# Altium PCB Main.PcbDoc (part 1 of 2)
Units mm, origin at the board's own origin, x right, y up, seen from the top; angles counter-clockwise.
Board outline 200 x 100 mm, 2 copper layers (Top Layer, Bottom Layer), stack 1.57 mm thick; 127 components, 91 nets, 374 pads, 81 vias.
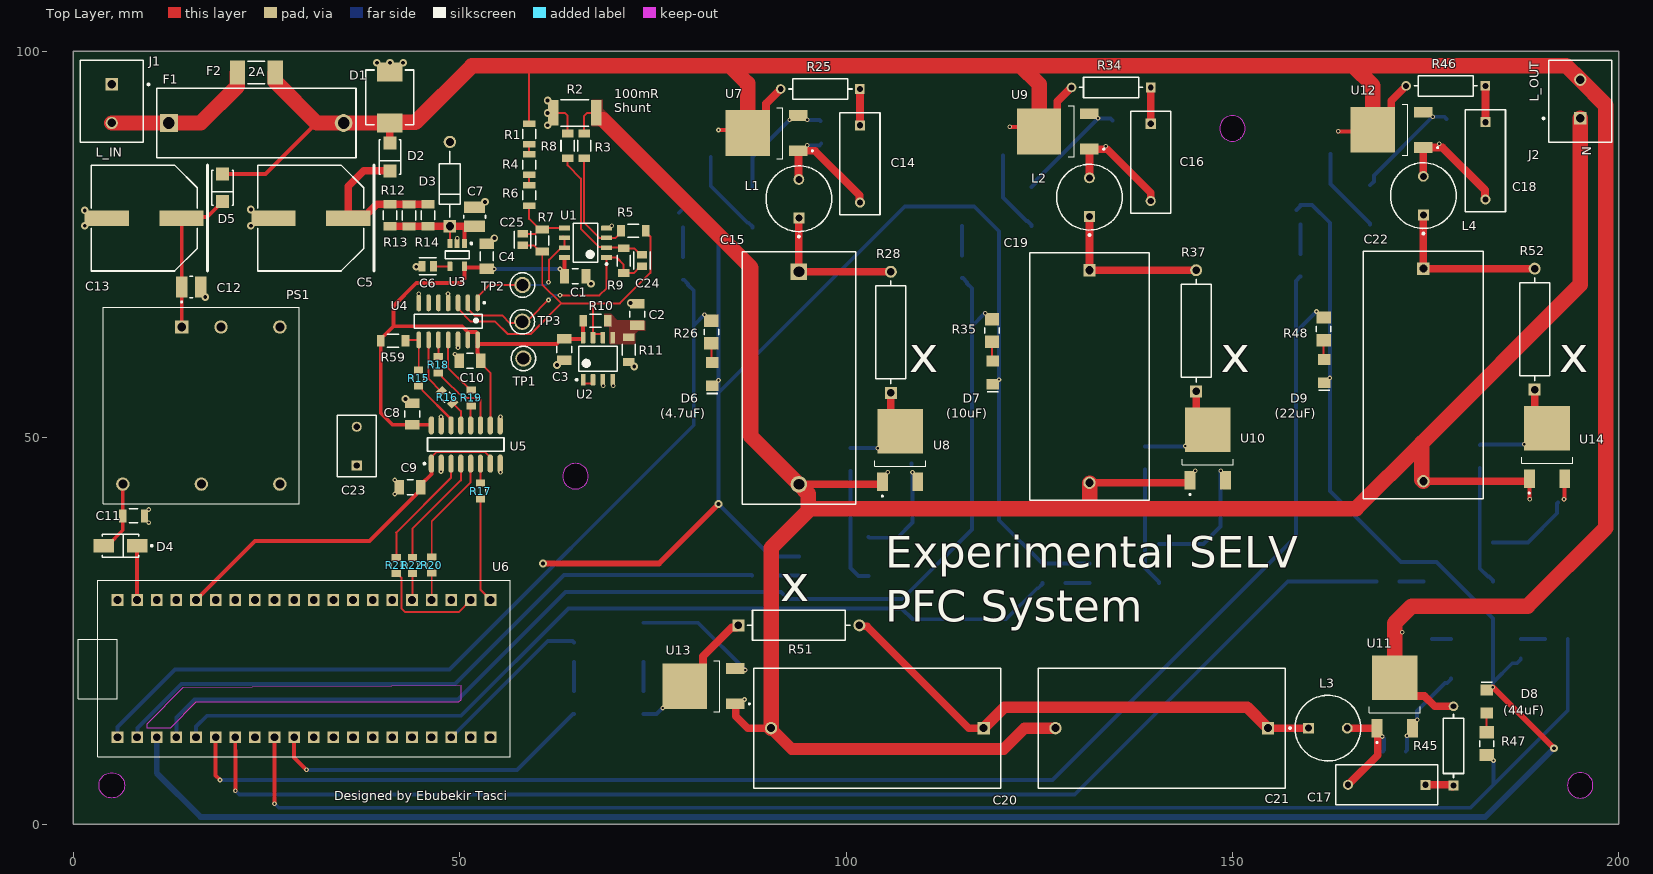
[diagram p0: Top Layer view]
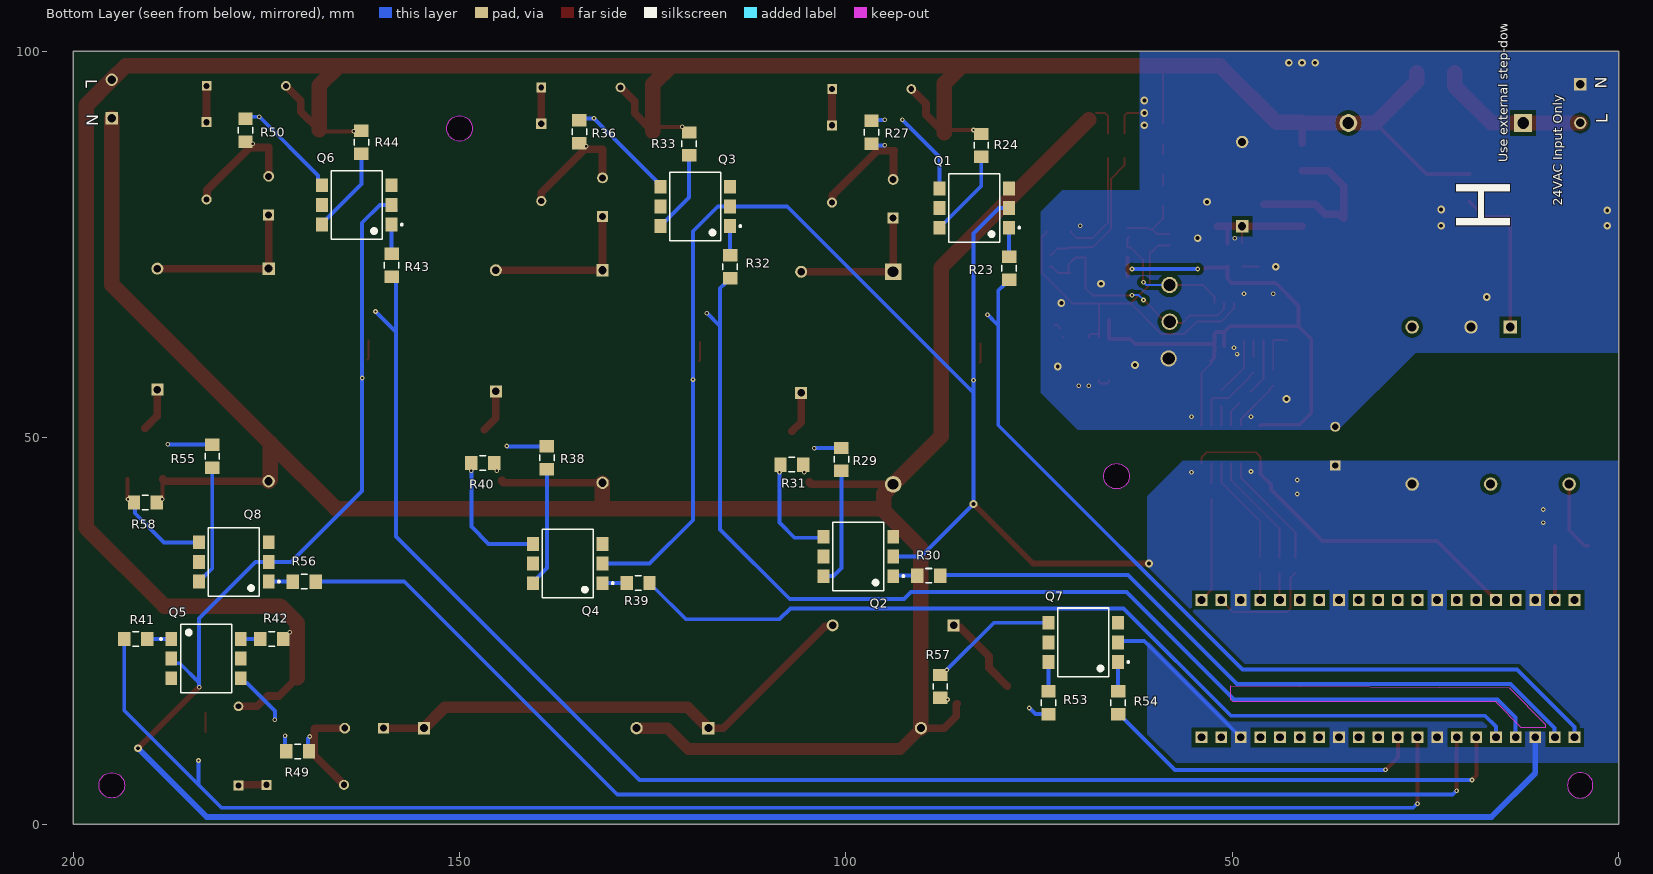
[diagram p1: Bottom Layer view, seen from below]
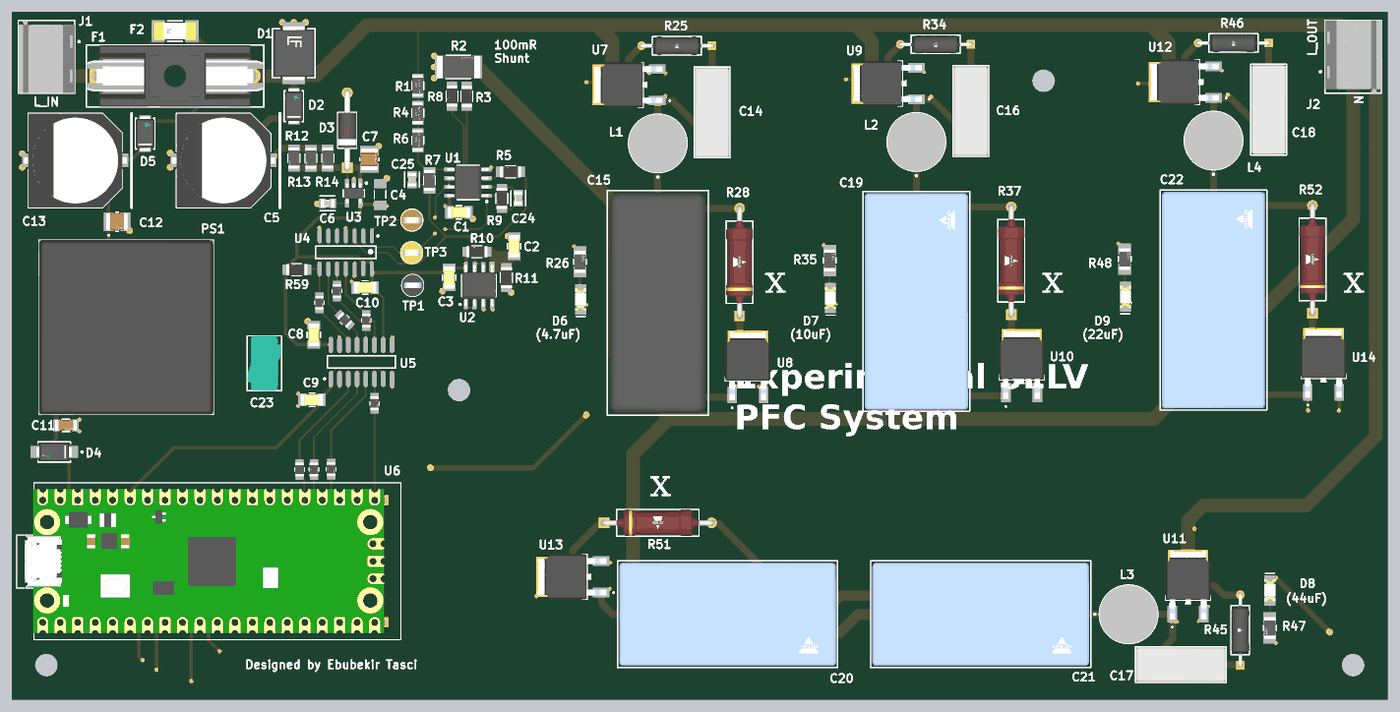
[diagram p3: 3D render of the assembled board from above, using the file's embedded part models]
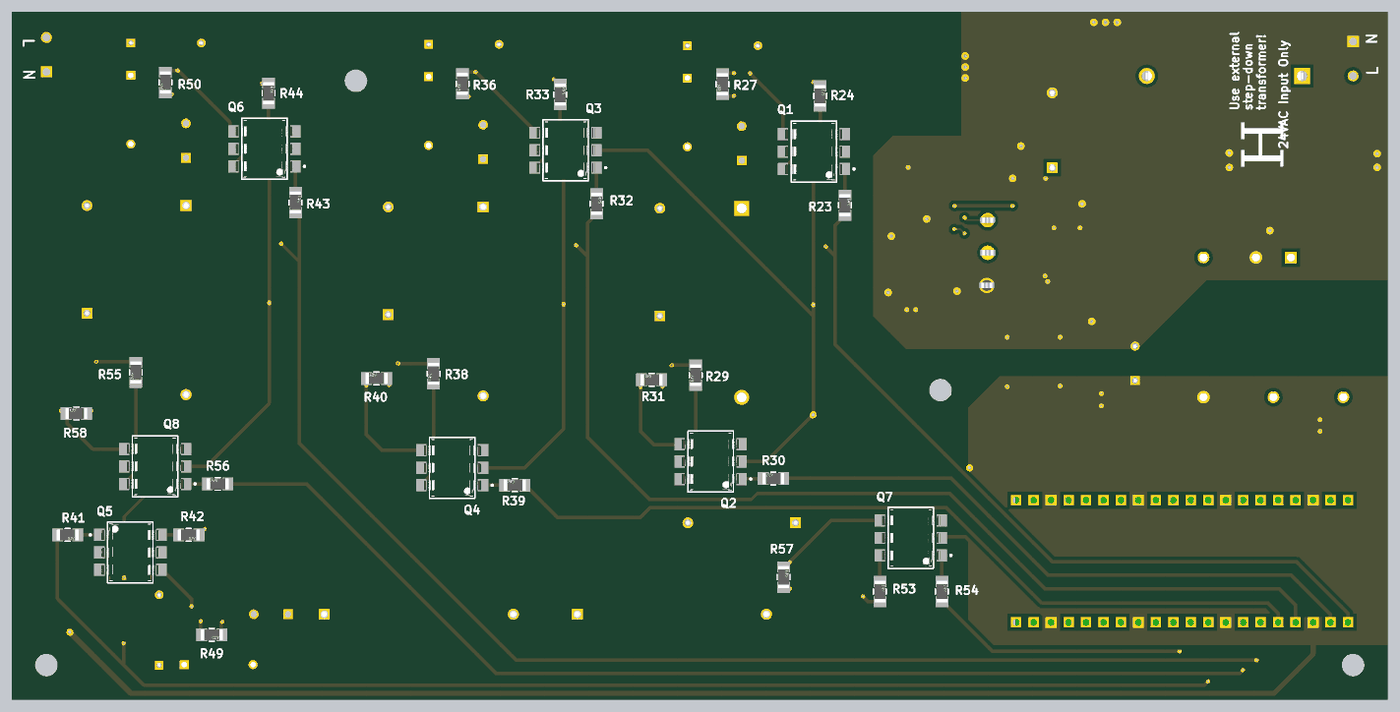
[diagram p4: 3D render of the assembled board from below, using the file's embedded part models]

## Layer stack, top to bottom
Top Solder: solder mask 0.0102, Solder Resist, Dk 3.5
Top Layer: signal copper 0.0356
Dielectric 1: core 1.4986, Core-043, Dk 4.3
Bottom Layer: signal copper 0.0356
Bottom Solder: solder mask 0.0102, Solder Resist, Dk 3.5

## Board outline
0,0 200,0 200,100 0,100
cut-out: 148.35,90 ccw(c150,90) 150,88.35 ccw(c150,90) 151.65,90 ccw(c150,90) 150,91.65 ccw(c150,90)
cut-out: 193.35,5 ccw(c195,5) 195,3.35 ccw(c195,5) 196.65,5 ccw(c195,5) 195,6.65 ccw(c195,5)
cut-out: 63.35,45 ccw(c65,45) 65,43.35 ccw(c65,45) 66.65,45 ccw(c65,45) 65,46.65 ccw(c65,45)
cut-out: 5,3.35 cw(c5,5) 3.35,5 cw(c5,5) 5,6.65 cw(c5,5) 6.65,5 cw(c5,5)

## Design rules (kind name [scope] priority, off if disabled: settings)
Clearance [All] p1: gap=0.125 ignorepadtopadclearanceinfootprint=TRUE except(0.5: Arc-Fill Arc-Poly Arc-Region Track-Fill Track-Poly Track-Region SMDPad-Fill SMDPad-Poly SMDPad-Region THPad-Fill THPad-Poly THPad-Region Via-Fill Via-Poly Via-Region Fill-Fill Fill-Poly Fill-Region Poly-Poly Poly-Region Region-Region) // JLCPCB_Standard_5mil
HoleSize [All] p1: absolutevalues=TRUE maxlimit=6.35 minlimit=0.3 maxpercent=80.000 minpercent=20.000 // JLCPCB_Min_0.3mm
HoleToHoleClearance [All] p1: gap=0.2 allowstackedmicrovias=TRUE // JLCPCB_SafeMin_20mil
MinimumSolderMaskSliver [All] p1: minsoldermaskwidth=0.1
PlaneClearance [All] p1: clearance=0.254
PlaneConnect [All] p1: planeconnectstyle=Direct reliefexpansion=0.254 reliefentries=4 reliefconductorwidth=0.254 reliefairgap=0.254
PolygonConnect [All] p1: connectstyle=Direct reliefconductorwidth=0.254 reliefentries=4 polygonreliefangle="90 Angle" airgapwidth=0.254
RoutingVias [All] p1: holewidth=0.305 width=0.457 viastyle="Through Hole" minholewidth=0.305 minwidth=0.457 maxholewidth=3.302 maxwidth=6.35 // JLCPCB_UserSpec_0.3mmHole_0.45mmDia
ShortCircuit AllowRF [InComponent('FL1') vs InNet('GND')] p1: allowed=TRUE
ShortCircuit [All] p2: allowed=FALSE
SignalStimulus "Schematic Signal Stimulus_1" [InNet('AGND')] p1: kind=1 level=1 starttime=0.000 stoptime=10.00m periodtime=20.00m
SignalStimulus "Schematic Signal Stimulus" [InNet('NetF1_1')] p2: kind=1 level=1 starttime=0.000 stoptime=10.00m periodtime=20.00m
SilkToSilkClearance [All] p1: silktosilkclearance=0.152
SilkToSolderMaskClearance [IsPad] p1: minsilkscreentomaskgap=0.152 clearancetoexposedcopper=TRUE // JLCPCB_Standard_0.15mm
SolderMaskExpansion Via_Expansion [IsVia] p1: expansion=0 istentingtop=FALSE
SolderMaskExpansion [All] p2: expansion=0.05 istentingtop=FALSE // JLCPCB_Standard
SupplyNets "Schematic Supply Nets_12" [InNet('NetF1_1')] p1: voltage=230.0
SupplyNets "Schematic Supply Nets_11" [InNet('+3V3_D')] p2: voltage=0.000
SupplyNets "Schematic Supply Nets_10" [InNet('DGND')] p3: voltage=0.000
SupplyNets "Schematic Supply Nets_9" [InNet('+5V')] p4: voltage=0.000
SupplyNets "Schematic Supply Nets_8" [InNet('AGND')] p5: voltage=0.000
SupplyNets "Schematic Supply Nets_7" [InNet('N')] p6: voltage=0.000
SupplyNets "Schematic Supply Nets_6" [InNet('+3V3_A')] p7: voltage=0.000
SupplyNets "Schematic Supply Nets_5" [InNet('L')] p8: voltage=0.000
SupplyNets "Schematic Supply Nets_4" [InNet('+1V65')] p9: voltage=0.000
Width [All] p1: maxlimit=2.54 minlimit=0.127 preferedwidth=0.254 // JLCPCB_Standard_5mil
22 further rules are at their usual default settings.

## Classes and differential pairs
component class Capacitor_Bank: C14 C15 C16 C17 C18 C19 C20 C21 C22 D6 D7 D8 D9 L1 L2 L3 L4 Q1 Q2 Q3 Q4 Q5 Q6 Q7 Q8 R23 R24 R25 R26 R27 R28 R29 R30 R31 R32 R33 R34 R35 R36 R37 R38 R39 R40 R41 R42 R43 R44 R45 R46 R47 R48 R49 R50 R51 R52 R53 R54 R55 R56 R57 R58 U7 U8 U9 U10 U11 U12 U13 U14
component class Measurement_Control: C1 C2 C3 C4 C5 C6 C7 C8 C9 C10 C11 C12 C13 C23 C24 C25 D1 D2 D3 D4 D5 F1 F2 J1 J2 PS1 R1 R2 R3 R4 R5 R6 R7 R8 R9 R10 R11 R12 R13 R14 R15 R16 R17 R18 R19 R20 R21 R22 R59 TP1 TP2 TP3 U1 U2 U3 U4 U5 U6

## Components (designator, comment, footprint, x,y, rotation, side; value= is the part's Value field where it differs from the comment)
C1 "100nF 1206" FP-C1206X104J3GACTU-MFG 64.967,70.861 r0 top
C2 "100nF 1206" FP-C1206X104J3GACTU-MFG 72.996,65.942 r90 top
C3 "100nF 1206" FP-C1206X104J3GACTU-MFG 63.561,61.378 r270 top
C4 "2.2uF 1206" CAPC1206(3216)190_M 53.533,73.459 r270 top value=2.2uF
C5 "EEVFK1J221Q" PNSC-FK-V-H13_V 30.75,78.4 r180 top
C6 "10nF 0805" FP-C0805C-DN-MFG 45.888,72.16 r180 top value="10,000 pF"
C7 "1uF 1210" FP-CL32-IPC_C 51.955,78.565 r90 top
C8 "100nF 1206" FP-C1206X104J3GACTU-MFG 43.871,53.043 r90 top
C9 "100nF 1206" FP-C1206X104J3GACTU-MFG 43.614,43.591 r180 top
C10 "100nF 1206" FP-C1206X104J3GACTU-MFG 51.349,59.928 r180 top
C11 "10uF 1206" FP-C1206C-EH-MFG 7.83,39.861 r0 top value=10uF
C12 "1uF 1210" FP-CL32-IPC_C 15.275,69.494 r0 top
C13 "EEVFK1J221Q" PNSC-FK-V-H13_V 9.2,78.4 r180 top
C14 "10nF Y2" FP-R46KF310040P1M-MFG 101.8,85.4 r270 top
C15 "4.7uF PP" FP-C4BUY-MFG 93.9,57.7 r270 top
C16 "10nF Y2" FP-R46KF310040P1M-MFG 139.428,85.6 r270 top
C17 "10nF Y2" FP-R46KF310040P1M-MFG 169.958,5.071 r180 top
C18 "10nF Y2" FP-R46KF310040P1M-MFG 182.728,85.8 r270 top
C19 "10uF PP" FP-F17725102000-MFG 131.5,57.9 r270 top
C20 "22uF PP" FP-F17725102000-MFG 104.05,12.4 r180 top
C21 "22uF PP" FP-F17725102000-MFG 140.85,12.4 r180 top
C22 "22uF PP" FP-F17725102000-MFG 174.7,58.1 r270 top
C23 "2.2nF Y2" FP-DE2_D8_T5_F5_d0_6-0_05-MFG 36.7,48.9 r90 top
C24 "10nF 0805" FP-C0805C-DN-MFG 73.608,72.909 r270 top value="10,000 pF"
C25 "10nF 0805" FP-C0805C-DN-MFG 58.165,75.61 r90 top value="10,000 pF"
D1 "SMCJ36CA" FP-SMCJ-MFG 40.98,94 r90 top
D2 "M7-HT" FP-SMA-MFG 40.98,86.3 r90 top
D3 "1N4742APE3/TR8" FP-1N4742APE3-TR8-MFG 48.742,82.794 r90 top
D4 "SS14" FP-403AE-MFG 6.13,36 r0 top
D5 "M7-HT" FP-SMA-MFG 19.349,82.316 r90 top
D6 "1206 GREEN" WL-SMCW_1206_150120xx75000 82.7,58.2 r90 top
D7 "1206 GREEN" WL-SMCW_1206_150120xx75000 119,58.4 r90 top
D8 "1206 GREEN" WL-SMCW_1206_150120xx75000 182.9,15.856 r270 top
D9 "1206 GREEN" WL-SMCW_1206_150120xx75000 161.9,58.6 r90 top
F1 "64600001223" FP-64600001223-MFG 23.7,90.7 r0 top
F2 "SEF1300" FP-0451-MFG 23.7,97.229 r0 top
J1 "282836-2" TECO-282836-2_V 5,93.2 r270 top
J2 "282836-2" TECO-282836-2_V 195,93.8 r90 top
L1 "820uH 1A" INDR62-500-1100X850X1100 93.9,80.9 r90 top
L2 "820uH 1A" INDR62-500-1100X850X1100 131.5,81.1 r90 top
L3 "820uH 1A" INDR62-500-1100X850X1100 162.354,12.4 r0 top
L4 "820uH 1A" INDR62-500-1100X850X1100 174.7,81.3 r90 top
PS1 "REC20K-4805SZ" CONV_REC20K-4805SZ 16.59,54.14 r270 top
Q1 "MOC3063S-TA1" FP-646BY-MFG 83.4,79.7 r0 bottom
Q2 "MOC3023XSM" FP-646BY-MFG 98.405,34.61 r0 bottom
Q3 "MOC3063S-TA1" FP-646BY-MFG 119.5,79.9 r0 bottom
Q4 "MOC3023XSM" FP-646BY-MFG 136.005,33.7 r0 bottom
Q5 "MOC3063S-TA1" FP-646BY-MFG 182.8,21.4 r180 bottom
Q6 "MOC3063S-TA1" FP-646BY-MFG 163.3,80.1 r0 bottom
Q7 "MOC3023XSM" FP-646BY-MFG 69.3,23.5 r0 bottom
Q8 "MOC3023XSM" FP-646BY-MFG 179.205,33.9 r0 bottom
R1 "100k 1206" FP-RQ732B-IPC_C 59,89.273 r90 top value=100KΩ
R2 "VMS-R100-1.0-U" FP-CRA2512-IPC_C 64.9,92 r0 top
R3 "10k 1206" FP-RT1206-MFG 66.129,87.746 r90 top value=10KΩ
R4 "100k 1206" FP-RQ732B-IPC_C 59,85.307 r90 top value=100KΩ
R5 "33k 1206" FP-RT1206-MFG 72.479,76.756 r180 top value=33KΩ
R6 "100k 1206" FP-RQ732B-IPC_C 59,81.341 r90 top value=100KΩ
R7 "4.7k 1206" FP-AT1206-IPC_B 60.7,75.5 r90 top
R8 "10k 1206" FP-RT1206-MFG 63.975,87.746 r270 top value=10KΩ
R9 "33k 1206" FP-RT1206-MFG 71.229,72.886 r270 top value=33KΩ
R10 "10k 1206" FP-RT1206-MFG 67.591,65.129 r180 top value=10KΩ
R11 "10k 1206" FP-RT1206-MFG 71.879,61.363 r90 top value=10KΩ
R12 "4.7k 1206" FP-AT1206-IPC_B 40.991,78.763 r270 top
R13 "4.7k 1206" FP-AT1206-IPC_B 43.457,78.729 r270 top
R14 "4.7k 1206" FP-AT1206-IPC_B 45.923,78.766 r270 top
R15 "33R 0805" FP-RT0805-MFG 44.7,57.7 r270 top value=33Ω
R16 "33R 0805" FP-RT0805-MFG 48.382,55.208 r315 top value=33Ω
R17 "33R 0805" FP-RT0805-MFG 52.714,43.071 r270 top value=33Ω
R18 "33R 0805" FP-RT0805-MFG 47.252,59.408 r270 top value=33Ω
R19 "33R 0805" FP-RT0805-MFG 51.504,55.129 r270 top value=33Ω
R20 "33R 0805" FP-RT0805-MFG 46.4,33.5 r270 top value=33Ω
R21 "33R 0805" FP-RT0805-MFG 41.813,33.46 r270 top value=33Ω
R22 "33R 0805" FP-RT0805-MFG 43.902,33.46 r270 top value=33Ω
R23 "330R 1206" FP-RMCF1206-IPC_A 78.895,71.897 r90 bottom
R24 "330R 1206" FP-RMCF1206-IPC_A 82.5,87.8 r90 bottom
R25 "39R 1W" FP-G001R1000FE1280-MFG 96.672,95.1 r180 top
R26 "330R 1206" FP-RMCF1206-IPC_A 82.584,63.656 r90 top
R27 "330R 1206" FP-RMCF1206-IPC_A 96.7,89.5 r270 bottom
R28 "100R 2W" FP-PR02000201003JA100-MFG 105.8,63.62 r90 top
R29 "330R 1206" FP-RMCF1206-IPC_A 100.6,47.176 r270 bottom
R30 "330R 1206" FP-RMCF1206-IPC_A 89.299,32.131 r0 bottom
R31 "330R 1206" FP-RMCF1206-IPC_A 107,46.5 r0 bottom
R32 "330R 1206" FP-RMCF1206-IPC_A 114.995,72.097 r90 bottom
R33 "330R 1206" FP-RMCF1206-IPC_A 120.3,88 r90 bottom
R34 "39R 1W" FP-G001R1000FE1280-MFG 134.3,95.3 r180 top
R35 "330R 1206" FP-RMCF1206-IPC_A 118.891,63.856 r90 top
R36 "330R 1206" FP-RMCF1206-IPC_A 134.5,89.554 r270 bottom
R37 "100R 2W" FP-PR02000201003JA100-MFG 145.3,63.82 r90 top
R38 "330R 1206" FP-RMCF1206-IPC_A 138.7,47.376 r270 bottom
R39 "330R 1206" FP-RMCF1206-IPC_A 126.899,31.184 r0 bottom
R40 "330R 1206" FP-RMCF1206-IPC_A 147,46.7 r0 bottom
R41 "330R 1206" FP-RMCF1206-IPC_A 191.906,23.94 r180 bottom
R42 "330R 1206" FP-RMCF1206-IPC_A 174.304,23.94 r180 bottom
R43 "330R 1206" FP-RMCF1206-IPC_A 158.795,72.297 r90 bottom
R44 "330R 1206" FP-RMCF1206-IPC_A 162.7,88.2 r90 bottom
R45 "39R 1W" FP-G001R1000FE1280-MFG 178.6,10.1 r90 top
R46 "39R 1W" FP-G001R1000FE1280-MFG 177.6,95.5 r180 top
R47 "330R 1206" FP-RMCF1206-IPC_A 182.9,10.4 r270 top
R48 "330R 1206" FP-RMCF1206-IPC_A 161.799,64.056 r90 top
R49 "330R 1206" FP-RMCF1206-IPC_A 170.95,9.4 r180 bottom
R50 "330R 1206" FP-RMCF1206-IPC_A 177.7,89.754 r270 bottom
R51 "100R 2W" FP-PR02000201003JA100-MFG 93.9,25.7 r0 top
R52 "100R 2W" FP-PR02000201003JA100-MFG 189.1,64.02 r90 top
R53 "330R 1206" FP-RMCF1206-IPC_A 73.805,15.697 r90 bottom
R54 "330R 1206" FP-RMCF1206-IPC_A 64.795,15.697 r90 bottom
R55 "330R 1206" FP-RMCF1206-IPC_A 182,47.576 r270 bottom
R56 "330R 1206" FP-RMCF1206-IPC_A 170.099,31.36 r0 bottom
R57 "330R 1206" FP-RMCF1206-IPC_A 87.8,17.8 r90 bottom
R58 "330R 1206" FP-RMCF1206-IPC_A 190.65,41.6 r0 bottom
R59 "10k 1206" FP-RT1206-MFG 41.403,62.521 r180 top value=10KΩ
TP1 "5011" KSTN-5011_V 58.255,60.229 r0 top
TP2 "5013" KSTN-5013_V 58.142,69.737 r0 top
TP3 "5014" KSTN-5014_V 58.116,64.983 r0 top
U1 "OPA2333AIDR" D0008A_N 66.3,75.2 r180 top
U2 "OPA2333AIDR" D0008A_N 67.9,60.2 r90 top
U3 "LP2985-33DBVR" DBV0005A_M 49.692,73.635 r270 top
U4 "MCP3204T-CI/SL" SOIC-SL14_N 48.532,65.037 r270 top
U5 "Si8641BC-B-IS1" SLAB-SOIC-16-NB_M 50.8,49.1 r90 top
U6 "RASPBERRY_PI_PICO_2" RASPBERRY_PI_PICO 28.6,20.1 r90 top
U7 "BT136S-600E,118" IC_BT136S-600E,118 89.703,89.404 r180 top
U8 "BT136S-600E,118" IC_BT136S-600E,118 107,48.375 r90 top
U9 "BT136S-600E,118" IC_BT136S-600E,118 127.4,89.604 r180 top
U10 "BT136S-600E,118" IC_BT136S-600E,118 146.8,48.575 r90 top
U11 "BT136S-600E,118" IC_BT136S-600E,118 171,16.5 r90 top
U12 "BT136S-600E,118" IC_BT136S-600E,118 170.6,89.804 r180 top
U13 "BT136S-600E,118" IC_BT136S-600E,118 81.546,17.847 r180 top
U14 "BT136S-600E,118" IC_BT136S-600E,118 190.7,48.775 r90 top

## Footprints (in the part's own frame and the unit in brackets; to place one, negate y for a bottom-side part, rotate by r counter-clockwise, add the part's x,y. Pads: shape width x height; smd on the part's side, far side on the other; paste and mask are expansions set on the pad)
CAPC1206(3216)190_M [mm] "Chip Capacitor, Body 3.2x1.6mm, Height 1.9mm, IPC Low Density"
  rect 1.35x1.9 smd: 1(-1.6,0) 2(1.6,0)
  silkscreen extent -0.55,-0.85 0.55,0.85, body extent -1.7,-0.9 1.7,0.9, height 1.9
CONV_REC20K-4805SZ [mm]
  rect 1.725x1.725 / inner round 1.725 / far side rect 1.725x1.725 hole 1.15: 1(-10.16,-2.54)
  round 1.725 hole 1.15: 2(-10.16,2.54) 3(-10.16,10.16) 4(10.16,10.16) 5(10.16,0) 6(10.16,-10.16)
  silkscreen extent -13.5,-12.7 12.7,12.7, body extent -12.7,-12.7 12.7,12.7, height 10.2
D0008A_N [mm] "SOIC, 8-Leads, Body 5x4mm, Pitch 1.27mm, IPC Medium Density"
  rrect17% 1.45x0.6 smd: 1(-2.725,1.905) 2(-2.725,0.635) 3(-2.725,-0.635) 4(-2.725,-1.905) 5(2.725,-1.905) 6(2.725,-0.635) 7(2.725,0.635) 8(2.725,1.905)
  silkscreen extent -2.85,-2.5 1.6,2.88, body extent -3,-2.45 3,2.45, height 1.63
DBV0005A_M [mm] "SOT23, 5-Leads, Body 3.05x1.75mm, Pitch 0.95mm, IPC Low Density"
  rrect15% 1.2x0.65 smd: 1(-1.475,0.95) 2(-1.475,0) 3(-1.475,-0.95) 4(1.475,-0.95) 5(1.475,0.95)
  silkscreen extent -1.6,-1.55 0.5,1.95, body extent -1.42,-1.46 1.42,1.46, height 1.08
FP-1N4742APE3-TR8-MFG [mm]
  rect 1.6x1.6 hole 1.05 paste-2539.97 mask+0: 1(-5.455,0)
  round 1.6 hole 1.05 paste-2539.97 mask+0: 2(5.455,0)
  silkscreen extent -4.25,-1.36 4.25,1.36, body extent -6.35,-1.46 6.35,1.46, height 0.25
FP-403AE-MFG [mm]
  rect 2.65x1.75 smd paste+0 mask+0: 1(-2.15,0) 2(2.15,0)
  silkscreen extent -2.37,-1.48 4.17,1.48, body extent -3.58,-1.58 3.57,1.58, height 0.25
FP-0451-MFG [mil]
  rect 77x124 smd paste+0 mask+0: 1(-96.5,0) 2(96.5,0)
  silkscreen extent -43,-58 43,58, body extent -139,-66 139,66, height 10
FP-646BY-MFG [mm]
  rect 1.52x1.78 smd paste+0 mask+0: 1(-4.505,2.54) 2(-4.505,0) 3(-4.505,-2.54) 4(4.505,-2.54) 5(4.505,0) 6(4.505,2.54)
  silkscreen extent -5.95,-4.44 3.3,4.44, body extent -4.58,-4.26 4.58,4.26, height 4.95
FP-64600001223-MFG [mm]
  rect 2.3x2.3 hole 1.5 paste-2539.97 mask+0: 1(-11.3,0)
  round 2.3 hole 1.5 paste-2539.97 mask+0: 2(11.3,0)
  silkscreen extent -12.9,-4.5 12.9,4.5, body extent -13,-4.6 13,4.6, height 0.25
FP-AT1206-IPC_B [mm]
  rect 1.058x1.712 smd paste+0 mask+0: 1(-1.427,0) 2(1.427,0)
  silkscreen extent -0.6,-0.86 0.6,0.86, body extent -2.21,-1.11 2.21,1.11, height 0.25
FP-C4BUY-MFG [mm]
  rect 2.15x2.15 hole 1.4 paste-2539.97 mask+0: 1(-13.75,0)
  round 2.15 hole 1.4 paste-2539.97 mask+0: 2(13.75,0)
  silkscreen extent -16.35,-7.35 16.35,7.35, body extent -16.45,-7.45 16.45,7.45, height 0.25
FP-C0805C-DN-MFG [mm]
  rect 0.95x1.35 smd paste+0 mask+0: 1(-0.75,0) 2(0.75,0)
  silkscreen extent -1.1,-1.07 1.1,1.07, body extent -1.4,-0.85 1.4,0.85, height 0.25
FP-C1206C-EH-MFG [mm]
  rect 0.95x1.7 smd paste+0 mask+0: 1(-1.4,0) 2(1.4,0)
  silkscreen extent -0.55,-0.9 0.55,0.9, body extent -2,-1 2,1, height 0.25
FP-C1206X104J3GACTU-MFG [mm]
  rect 1.22x1.86 smd paste+0 mask+0: 1(-1.39,0) 2(1.39,0)
  silkscreen extent -0.41,-0.97 0.41,0.97, body extent -2.12,-1.08 2.12,1.08, height 0.25
FP-CL32-IPC_C [mm]
  rect 1.453x2.704 smd paste+0 mask+0: 1(-1.225,0) 2(1.225,0)
  silkscreen extent -0.2,-1.4 0.2,1.4, body extent -2.05,-1.5 2.05,1.5, height 0.25
FP-CRA2512-IPC_C [mm]
  rect 1.356x3.306 smd paste+0 mask+0: 1(-2.775,0) 2(2.775,0)
  silkscreen extent -1.8,-1.7 1.8,1.7, body extent -3.55,-1.8 3.55,1.8, height 0.25
FP-DE2_D8_T5_F5_d0_6-0_05-MFG [mm]
  rect 1.3x1.3 hole 0.8 paste-2539.97 mask+0: 1(-2.5,0)
  round 1.3 hole 0.8 paste-2539.97 mask+0: 2(2.5,0)
  silkscreen extent -4,-2.5 4,2.5, body extent -4.1,-2.6 4.1,2.6, height 0.25
FP-F17725102000-MFG [mm]
  rect 1.6x1.6 hole 1.05 paste-2539.97 mask+0: 1(-13.75,0)
  round 1.6 hole 1.05 paste-2539.97 mask+0: 2(13.75,0)
  silkscreen extent -16,-7.75 16,7.75, body extent -15.75,-7.5 15.75,7.5, height 25
FP-G001R1000FE1280-MFG [mm]
  rect 1.25x1.25 hole 0.75 paste-2539.97 mask+0: 1(-5.128,0)
  round 1.25 hole 0.75 paste-2539.97 mask+0: 2(5.128,0)
  silkscreen extent -4.1,-1.33 4.1,1.33, body extent -5.85,-1.43 5.85,1.43, height 0.25
FP-PR02000201003JA100-MFG [mm]
  rect 1.55x1.55 hole 1 paste-2539.97 mask+0: 1(-7.83,0)
  round 1.55 hole 1 paste-2539.97 mask+0: 2(7.83,0)
  silkscreen extent -6.66,-1.95 6.66,1.95, body extent -8.7,-2.05 8.7,2.05, height 0.25
FP-R46KF310040P1M-MFG [mm]
  rect 1.3x1.3 hole 0.8 paste-2539.97 mask+0: 1(-5,0)
  round 1.3 hole 0.8 paste-2539.97 mask+0: 2(5,0)
  silkscreen extent -6.6,-2.6 6.6,2.6, body extent -6.7,-2.7 6.7,2.7, height 0.25
FP-RMCF1206-IPC_A [mm]
  rect 1.604x1.858 smd paste+0 mask+0: 1(-1.476,0) 2(1.476,0)
  silkscreen extent -0.37,-0.93 0.37,0.93, body extent -1.6,-0.8 1.6,0.8, height 0.7
FP-RQ732B-IPC_C [mm]
  rect 0.858x1.612 smd paste+0 mask+0: 1(-1.327,0) 2(1.327,0)
  silkscreen extent -0.6,-0.85 0.6,0.85, body extent -1.86,-0.95 1.86,0.95, height 0.25
FP-RT0805-MFG [mm]
  rect 0.9x1.2 smd paste+0 mask+0: 1(-1.05,0) 2(1.05,0)
  silkscreen extent -0.23,-0.67 0.23,0.67, body extent -1.6,-0.77 1.6,0.77, height 0.25
FP-RT1206-MFG [mm]
  rect 1x1.5 smd paste+0 mask+0: 1(-1.6,0) 2(1.6,0)
  silkscreen extent -0.72,-0.85 0.72,0.85, body extent -2.2,-0.95 2.2,0.95, height 0.25
FP-SMA-MFG [mm]
  rect 1.7x1.68 smd paste+0 mask+0: 1(-1.79,0) 2(1.79,0)
  silkscreen extent -2.25,-1.4 2.25,1.4, body extent -2.74,-1.5 2.74,1.5, height 0.25
FP-SMCJ-MFG [mm]
  rect 2.4x3.3 smd paste+0 mask+0: 1(-3.3,0) 2(3.3,0)
  silkscreen extent -3.55,-3.11 3.55,3.11, body extent -4.6,-3.21 4.6,3.21, height 0.25
IC_BT136S-600E,118 [mm]
  rect 2.4x1.4 smd: 1(-4.1,2.285) 3(-4.1,-2.285)
  rect 5.75x5.9 smd paste-4: MB(2.425,0)
  silkscreen extent -6.05,-3.3 -1.35,3.3, body extent -4.86,-3.3 5.14,3.3, height 2.38
INDR62-500-1100X850X1100 [mm] "THD, 2-Leads, Dia 8.5mm, Pitch 5mm"
  rect 1.4x1.4 hole 0.9: 1(-2.5,0)
  round 1.4 hole 0.9: 2(2.5,0)
  silkscreen extent -5.02,-4.25 4.25,4.25, body extent -4.25,-4.24 4.25,4.24, height 11
KSTN-5011_V [mm] "Test Point, Dia 3.17mm"
  round 2.1 hole 1.6: 1(0,0)
  silkscreen extent -1.59,-1.58 1.59,1.58, body extent -1.59,-1.59 1.59,1.59, height 8.13
KSTN-5013_V [mm] "Test Point, Dia 3.17mm"
  round 2.1 hole 1.6: 1(0,0)
  silkscreen extent -1.59,-1.58 1.59,1.58, body extent -1.59,-1.59 1.59,1.59, height 8.13
KSTN-5014_V [mm] "Test Point, Dia 3.17mm"
  round 2.1 hole 1.6: 1(0,0)
  silkscreen extent -1.59,-1.58 1.59,1.58, body extent -1.59,-1.59 1.59,1.59, height 8.13
PNSC-FK-V-H13_V [mm] "CAPAE, 2-Leads, Body 13.70x13.70mm"
  rect 5.7x2 smd: 1(-4.85,0) 2(4.85,0)
  silkscreen extent -8.2,-6.85 6.85,6.85, body extent -7.5,-6.85 7.5,6.85, height 14
RASPBERRY_PI_PICO [mm]
  rect 1.508x1.508 / inner round 1.508 / far side rect 1.508x1.508 hole 1: 3V3(8.89,12.7) 3V3_EN(8.89,15.24) ADC_VREF(8.89,10.16) AGND(8.89,5.08) GND(8.89,17.78) GND2(8.89,-7.62) GND3(8.89,-20.32) GND4(-8.89,17.78) GND5(-8.89,5.08) GND6(-8.89,-7.62) GND7(-8.89,-20.32) GP0(-8.89,22.86) GP1(-8.89,20.32) GP2(-8.89,15.24) GP3(-8.89,12.7) GP4(-8.89,10.16) GP5(-8.89,7.62) GP6(-8.89,2.54) GP7(-8.89,0) GP8(-8.89,-2.54) GP9(-8.89,-5.08) GP10(-8.89,-10.16) GP11(-8.89,-12.7) GP12(-8.89,-15.24) GP13(-8.89,-17.78) GP14(-8.89,-22.86) GP15(-8.89,-25.4) GP16(8.89,-25.4) GP17(8.89,-22.86) GP18(8.89,-17.78) GP19(8.89,-15.24) GP20(8.89,-12.7) GP21(8.89,-10.16) GP22(8.89,-5.08) GP26_A0(8.89,0) GP27_A1(8.89,2.54) GP28_A2(8.89,7.62) RUN(8.89,-2.54) VBUS(8.89,22.86) VSYS(8.89,20.32)
  silkscreen extent -11.43,-27.94 11.43,27.94, body extent -10.5,-25.5 10.5,26.8, height 3.73
SLAB-SOIC-16-NB_M [mm] "SOIC, 16-Leads, Body 9.9x3.9mm, Pitch 1.27mm, IPC Low Density"
  oval 2.35x0.7 smd: 1(-2.475,4.445) 2(-2.475,3.175) 3(-2.475,1.905) 4(-2.475,0.635) 5(-2.475,-0.635) 6(-2.475,-1.905) 7(-2.475,-3.175) 8(-2.475,-4.445) 9(2.475,-4.445) 10(2.475,-3.175) 11(2.475,-1.905) 12(2.475,-0.635) 13(2.475,0.635) 14(2.475,1.905) 15(2.475,3.175) 16(2.475,4.445)
  silkscreen extent -2.6,-4.95 0.9,5.47, body extent -1.95,-4.95 1.95,4.95, height 1.75
SOIC-SL14_N [mm] "SOIC, 14-Leads, Body 8.7x3.9mm, Pitch 1.27mm, IPC Medium Density"
  oval 2.2x0.6 smd: 1(-2.4,3.81) 2(-2.4,2.54) 3(-2.4,1.27) 4(-2.4,0) 5(-2.4,-1.27) 6(-2.4,-2.54) 7(-2.4,-3.81) 8(2.4,-3.81) 9(2.4,-2.54) 10(2.4,-1.27) 11(2.4,0) 12(2.4,1.27) 13(2.4,2.54) 14(2.4,3.81)
  silkscreen extent -2.52,-4.4 0.9,4.79, body extent -2,-4.38 2,4.38, height 1.75
TECO-282836-2_V [mm] "Female Header, Pitch 5mm, 1 x 2 Position, Height 10mm"
  rect 1.6x1.6 hole 1.1: 1(-2.5,0)
  round 1.6 hole 1.1: 2(2.5,0)
  silkscreen extent -5.6,-4.1 5,4.88, body extent -5.6,-4.1 5,4.1, height 10
WL-SMCW_1206_150120xx75000 [mm] "SMD Mono-color Chip LED, body 3.2x1.6mm"
  rect 1.4x1.6 smd: 1(-1.5,0) 2(1.5,0)
  silkscreen extent -2.6,-0.75 -2.4,0.75, body extent -1.6,-0.8 1.6,0.8, height 0.68

## Part data
C1 C2 C3 C8 C9 C10: library part CMP-03020-034648-1, "CAP CER 0.1UF 25V C0G/NP0 1206 C1206X104J3GACTU", RoHS Compliant=Yes
C4: library part CMP-1037-04830-1, "CAP 2.2uF 50V ±5% 1206 (3216 Metric) Thickness 1.9mm SMD", Case-EIA=1206, Case-Metric=3216, Rated Voltage="50 V", Tolerance=Â±5%, Max Thickness="1.9 mm", Technology=SMT
C5 C13: library part CMP-2000-06222-1, "Aluminum Electrolytic Capacitor, 220 uF, +/- 20%, 63 V, 2-Pin SMD (Size Code H13), -55 to 105 degC, RoHS, Tape and Reel", AE Capacitor Case=RadialCan-SMD, Capacitance=220µF, Capacitance Tolerance=±20%, Capacitor Case Style=SMD, Life Time @ Temperature=2000hours@105°C, Manufacturer=Panasonic, Operating life Time=2000h, Operating Temperature Max=105°C, Operating Temperature Min=-55°C, Operating Temperature Range=-55°Cto+105°C, Package / Case=H13, Package Description="2-Pin Electrolytic Aluminum Capacitor, Body 13.5 x 13.5 mm", Package Reference=FK-V-H13, Power Factor=0.08, Power Factor Frequency=120Hz, Ripple Current AC=800mA, Ripple Current Frequency=100kHz, Tolerance +=20%, Voltage Rating=63V, Capacitance Tolerance ±=±20%, Capacitor Terminals=SMD, Datasheet URL=https://industrial.panasonic.com/cdbs/www-data/pdf/RDE0000/ABA0000C1181.pdf, Datasheet Version=03/2016, Diameter=12.5mm, External Length / Height=13.5mm, Height=13.5mm, Impedance=0.16ohm, Lifetime @ Temperature=2000hours@105°C, Manufacturer URL=http://www.panasonic.com/, Mounting Technology=SurfaceMount, Operating Lifetime=2000h, Package URL=http://industrial.panasonic.com/cdbs/www-data/pdf/RDE0000/DME0000COL48.pdf, Packaging=CutTape, Product Range=PANASONIC-?????FK, Ripple Current Temperature=105°C, Series=FK, SVHC=NoSVHC(16-Dec-2013), Tolerance -=20%, Voltage Rating V DC=63V
C6 C24 C25: library part CMP-1036-03849-3, "CAP CER 10000PF 100V NP0 0805 C0805C103F1GACTU", Capacitance="10,000 pF", Manufacturer=KEMET, Manufacturer Part Number=C0805C103F1GACTU, Package=C0805C-DN, Temperature="-55°C to +125°C", Temperature Characteristic=C0G, Temperature Coefficient=30ppm/°C, Temperature Range High=+125°C, Temperature Range Low=-55°C, Tolerance=0.01, Voltage Rating="100 V", Automotive=No, Category=Cap, ComponentLink2Description=Datasheet, ComponentLink2URL=https://content.kemet.com/datasheets/KEM_C1003_C0G_SMD.pdf, Device Class L1="Passive Components", Device Class L2=Capacitors, Device Class L3="Ceramic Capacitors", Digikey Description="CAP CER 10000PF 100V NP0 0805", Height=0.88mm, Ipc Land Pattern Name=CAPC200125X78, Lead Free=Yes, Material=Ceramic, Mouser Description="Cap Ceramic 0.01uF 100V C0G 1% Pad SMD 0805 125C T/R", Octopart=https://octopart.com/c0805c103f1gactu-kemet-18614614, RoHS=TRUE
C7 C12: library part CMP-13271-002987-1, "Cap Ceramic 1uF 50V X7R ±10% SMD 1210 +125°C Embossed T/R CL32B105KBHNNNE", Capacitance=1uF, Case Code (Imperial)=1210, Case Code (Metric)=3225, Dielectric=X7R, Max Operating Temperature=125°C, Min Operating Temperature=-55°C, Package Quantity=1, Tolerance=10%, Voltage=50V, Case/Package=1210, Depth=2.5mm, Height=1.6mm, Length=3.2mm, Material=Ceramic, Mount="Surface Mount", Packaging="Tape and Reel", Radiation Hardening=No, Thickness=0.071inch, Voltage Rating=50V, Width=0.098inch
C11: library part CMP-03020-004605-1, "CAP CER 10UF 25V X7R 1206 C1206C106K3RACAUTO", Capacitance=10uF, Manufacturer=KEMET, Manufacturer Part Number=C1206C106K3RACAUTO, Package=C1206C-EH, Temperature="-55°C to +125°C", Temperature Characteristic=X7R, Temperature Coefficient=15%, Temperature Range High=+125°C, Temperature Range Low=-55°C, Tolerance=10%, Voltage Rating=25V, Automotive=Yes, Automotive Grade="Grade 1", Category=Cap, ComponentLink2Description=Datasheet, ComponentLink2URL=https://content.kemet.com/datasheets/KEM_C1023_X7R_AUTO_SMD.pdf, Device Class L1="Passive Components", Device Class L2=Capacitors, Device Class L3="Ceramic Capacitors", Digikey Description="CAP CER 10UF 25V X7R 1206", Height=1.8mm, Ipc Land Pattern Name=CAPC320160X160, Lead Free=Yes, Material=Ceramic, Octopart=https://octopart.com/c1206c106k3racauto-kemet-65707106, RoHS=TRUE
C14 C16 C17 C18: library part CMP-00212-22103502-1, "C43Q1103K6SC000 / CAP.FILM 10nF 300VAC ±10% 15mm Radial 13x12x6 Y2 MKP Metallized Polypropylene (PP) THT", Capacitance=100nF, Case/Package=Radial, Dielectric=PP, Max Operating Temperature=110°C, Min Operating Temperature=-40°C, Tolerance=20%, Voltage Rating=560V, Voltage Rating (AC)=275V, Depth=5mm, Dielectric Material=PP, Height=6mm, Height - Seated (Max)=12.0904mm, Lead Diameter=600µm, Lead Pitch=10mm, Length=13mm, Mount="Through Hole", NexarPartId=22103502, Packaging=Bulk, REACH SVHC="No SVHC", RoHS=Compliant, Schedule B=8532250010, Termination=Radial, Voltage Rating (DC)=560V, Width=5.9944mm
C15: library part CMP-03022-000053-1, "CAP.FILM 4.7uF 305VAC ±10% 27.5mm Radial 32x33x18 X2 MKP Metallized Polypropylene (PP) THT C42Q2475KBAC000"
C19: library part CMP-02419-000004-1, "C3D2K106KB00382 CAP.FILM 10uF 800VDC ±10% 27.5mm Radial 32x37x22 MKP Metallized Polypropylene (PP) THT", Capacitance=1uF, Dielectric Material=Polyester, Tolerance=10%, Voltage Rating (AC)=275V, Number of Pins=2, RoHS Compliant=Yes
C20 C21 C22: library part CMP-02419-000004-1, "C3D2H226JB00C00 CAP.FILM 22uF 500VDC ±5% 27.5mm Radial 32x37x22 MKP Metallized Polypropylene (PP) THT", Capacitance=1uF, Dielectric Material=Polyester, Tolerance=10%, Voltage Rating (AC)=275V, Number of Pins=2, RoHS Compliant=Yes
C23: library part CMP-06035-063093-1, "CAP CER 2200PF 250VAC RADIAL DE2E3KY222MN2AM01F", Capacitance=2.2nF, Case/Package=Radial, Max Operating Temperature=125°C, Min Operating Temperature=-40°C, Package Quantity=1000, Ratings=X1, Tolerance=20%, Height - Seated (Max)=0.433inch, Lead Free="Lead Free", Lead Pitch=0.197inch, Lead/Base Style="Formed Leads", Mount="Through Hole", Packaging="Tape and Reel", RoHS Compliant=Yes, Series=KY
D1: library part CMP-08607-000079-1, "TVS DIODE 36V 58.1V DO214AB", Breakdown Voltage=40V, Clamping Voltage=58.1V, Manufacturer="Littelfuse Inc", Max Junction Temp=+150°C, Package=SMCJ, Peak Pulse Current=25.9A, Peak Pulse Power=1500W, Reverse Standoff Voltage=36V, Temperature="-65°C to +150°C", Temperature Range Low=-65°C, Automotive=No, Category=Diode, ComponentLink2Description=Datasheet, ComponentLink2URL=https://www.littelfuse.com/~/media/electronics/datasheets/tvs_diodes/littelfuse_tvs_diode_smcj_datasheet.pdf.pdf, Device Class L1="Circuit Protection", Device Class L2="TVS Diodes", Device Class L3=unset, Digikey Description="TVS DIODE 36V 58.1V DO214AB", Direction=Bidirectional, Height=2.62mm, Lead Free=Yes, Manufacturer Part Number=SMCJ36CA, Mouser Description="SMCJ Series 58.1 V 1.5 kW Surface Mount Bi-Directional TVS Diode - DO-214AB", Number Of Channels=1, Octopart=https://octopart.com/smcj36ca-littelfuse-351690, RoHS=TRUE, Temperature Range High=+150°C
D2 D5: library part CMP-02540-000086-1, "DIODE GEN PURP 1KV 1A DO214AC", Average Rectified Current=1A, Case/Package=SMA, Forward Voltage=1.1V, Max Operating Temperature=150°C, Max Reverse Voltage (DC)=1kV, Min Operating Temperature=-55°C, Peak Non-Repetitive Surge Current=30A, Mount="Surface Mount", Number of Pins=2, Packaging="Tape and Reel", Reverse Recovery Time=1.8us, RoHS Compliant=Yes, Series=-
D3: library part CMP-06360-000055-1, "DIODE ZENER 12V 1W DO204AL"
D4: library part CMP-2000-04943-2, "DIODE SCHOTTKY 40V 1A SMA", Forward Current=1A, Manufacturer="ON Semiconductor", Max Junction Temp=+125°C, Max Repetitive Reverse Voltage=40V, Max Surge Forward Current=40A, Package=403AE, Peak Reverse Current=0.2mA, Temperature="-65°C to +125°C", Temperature Range Low=-65°C, Automotive=No, Category=Diode, ComponentLink2Description=Datasheet, ComponentLink2URL=https://www.onsemi.com/pub/Collateral/SS19-D.PDF, Device Class L1="Discrete Semiconductors", Device Class L2=Diodes, Device Class L3="Schottky Diodes", Digikey Description="DIODE SCHOTTKY 40V 1A SMA", Height=2.5mm, Lead Free=Yes, Manufacturer Part Number=SS14, Mouser Description="Schottky Diodes & Rectifiers SMA 40V 1.0A", Octopart=https://octopart.com/ss14-on+semiconductor-29205033, RoHS=TRUE, Standoff Height=0.05mm, Temperature Range High=+125°C
D6 D7 D8 D9: library part CMP-1426-00014-6, "LED Uni-Color Green 515nm 2-Pin Chip 1206(3216Metric) T/R", Case Code (Imperial)=1206, Case Code (Metric)=3216, Color=Green, Forward Current=100mA, Forward Voltage=3.2V, Manufacturer Lifecycle Status=ACTIVE, Max Junction Temperature (Tj)=95°C, Max Operating Temperature=85°C, Max Reverse Voltage (DC)=5V, Min Operating Temperature=-40°C, Power Dissipation=105mW, Test Current=20mA, Case/Package=1206, Dominant Wavelength=525nm, Height=680µm, Length=3.2mm, Lens Style="Clear, Rectangular", Lifecycle Status=Production, Luminous Intensity=450mcd, Mount="Surface Mount", Packaging="Tape and Reel", Peak Wavelength=515nm, REACH SVHC=Unknown, Reverse Voltage=5V, RoHS=Compliant, Viewing Angle=140°, Wavelength=525nm, Width=1.6mm, YEOL="1 = Estimated lifetime > 10 years"
F1: library part CMP-08604-000020-1, "FUSE BLOCK CART 250V 6.3A PCB", Fuse Current=6.3A, Manufacturer="Littelfuse Inc", Package=0, Voltage Rating Ac=250V, Automotive=No, Category=Fuse, ComponentLink2Description=Datasheet, ComponentLink2URL=https://www.littelfuse.com/~/media/electronics/datasheets/fuse_blocks/littelfuse_fuse_block_646_datasheet.pdf.pdf, Conn Orientation=Horizontal, Device Class L1="Circuit Protection", Device Class L2="Fuse Holders", Device Class L3=unset, Digikey Description="FUSE BLOCK CART 250V 6.3A PCB", Height=12mm, Lead Free=Yes, Manufacturer Part Number=64600001223, Mouser Description="Fuse Holder Screw Mount Bulk", Number Of Fuses=1, Octopart=https://octopart.com/64600001223-littelfuse-39645661, RoHS=TRUE, Voltage Rating Dc=250V
F2: library part CMP-08605-000063-1, "FUSE 3A 250V 6125 FAST SMD", Fuse Current=3A, Fuse Interrupt Ac Current=50A, Max Fuse Ac Voltage=250V, Package=0451, Temperature="-55°C to +125°C", Temperature Range High=+125°C, Temperature Range Low=-55°C, Automotive=No, Category=Fuse, ComponentLink2Description=Datasheet, ComponentLink2URL=https://www.littelfuse.com/~/media/electronics/datasheets/fuses/littelfuse_fuse_451_453_datasheet.pdf.pdf, Device Class L1="Circuit Protection", Device Class L2=Fuses, Device Class L3=unset, Fuse Blow Speed=Fast, Fuse I2T=1.65A2Sec, Fuse Interrupt Dc Current=50A, Height=2.94mm, Lead Free=Yes, Mouser Description="Surface Mount Fuses 250V 3A", RoHS=TRUE, Voltage Rating=250V
J1 J2: library part CMP-1684-00017-1, "Female Header, Pitch 5 mm, 1 x 2 Position, Height 10 mm, Tail Length 3.5 mm, Rohs, Bulk", Color=Green, Current=13.5A, Manufacturer="TE Connectivity", Package Description="Female Header, Pitch 5 mm, 1 x 2 Position, Height 10 mm, Tail Length 3.5 mm", Package Reference=THD, Standard Package=300, Voltage=300V, 3D Model=282836-2.pdf, Category=Connectors,Interconnects, Clamp Material - Plating=Brass-NickelPlated, Contact Material - Plating=Brass-TinPlated, Datasheet URL=http://www.te.com.cn/commerce/DocumentDelivery/DDEController?Action=showdoc&DocId=Catalog+Section%7F1308389_EUROSTYLE_TERMINAL_BLOCKS%7F0607%7Fpdf%7FEnglish%7FENG_CS_1308389_EUROSTYLE_TERMINAL_BLOCKS_0607.pdf%7F282836-2, Dynamic Catalog=BuchananSeries, Family=TerminalBlocks-WiretoBoard, Featured Product=EurostyleTerminalBlockConnectors, Features=Interlocking(Side), Housing Material=Polyamide(PA66),Nylon6/6, Manufacturer URL=http://www.te.com, Mating Orientation=HorizontalwithBoard, Mounting Type=ThroughHole, Number of Levels=1, Other Names="5ULV-02B / A98076", Packaging=Bulk, Pitch="0.197\"(5.00mm)", Positions Per Level=2, Product Training Modules=Wire-to-BoardEurostyleTerminalBlocks, RoHS Information=282836-2StatementofCompliance, Screw Material - Plating=Brass-NickelPlated, Screw Thread=M3, Series=Buchanan, Torque - Screw=0.68Nm(6Lb-In), Wire Gauge=16-30AWG, Wire Termination=Screw-RisingCageClamp
L1 L2 L3 L4: library part CMP-1747-00016-1, "IND TH 820uH 1000mA ISAT=1000mA %10 F=5/10x15.5", Max Operating Temperature="70 degC", Min Operating Temperature="0 degC", Mount="Through Hole", PackageDescription="2-Pin Radial Lead, Dia 8.5 mm, Pitch 5 mm", PackageReference=INDR62-500-1100X850X1100
PS1: library part CMP-068-000000-1, Package=None, Availability=Unavailable, Component Type=Standard, Design Item ID=REC20K-4805SZ, MF="Recom Power", MP=REC20K-4805SZ, Pin Count=6, Price=None, Source=REC20K-4805SZ.SchLib
Q1 Q3 Q5 Q6: library part CMP-07144-000013-1, "OPTOISOLATOR 4.17KV TRIAC 6SMD", Forward Current=30mA, Forward Voltage=1.3V, Isolation Voltage=4170Vrms, Manufacturer="ON Semiconductor", Manufacturer Part Number=MOC3063SM, Max Junction Temp=+100°C, Package=646BY, Power Dissipation=250mW, Reverse Voltage=6V, Temperature="-40°C to +85°C", Temperature Range High=+85°C, Temperature Range Low=-40°C, Automotive=No, Category=Trans, ComponentLink2Description=Datasheet, ComponentLink2URL=https://www.onsemi.com/pub/Collateral/MOC3163M-D.pdf, Device Class L1=Optoelectronics, Device Class L2=Optocouplers, Device Class L3=unset, Digikey Description="OPTOISOLATOR 4.17KV TRIAC 6SMD", Footprint Url=https://www.onsemi.com/pub/Collateral/646BY.PDF, Height=4.8mm, Lead Free=Yes, Mouser Description="Triac & SCR Output Optocouplers 6P OPTO TRIAC", Octopart=https://octopart.com/moc3063sm-on+semiconductor-84330445, RoHS=TRUE, Standoff Height=0.38mm
Q2 Q4 Q7 Q8: library part CMP-00278-84330366-1, "MOC3023XSM Triac Driver Output Optocoupler, 6-Pin DIP 400V Random Phase"
R1 R4 R6: library part CMP-03211-010469-1, "RQ732B 1206 100KΩ 0.4W 10ppm/°C 0.1% 200V RQ73C2B100KBTDF", Manufacturer=TE, Manufacturer Part Number=RQ73C2B100KBTDF, Package=RQ732B, Power Rating=0.4W, Resistance=100KΩ, Temperature="-55°C to +155°C", Temperature Coefficient=10ppm/°C, Temperature Range High=+155°C, Temperature Range Low=-55°C, Tolerance=0.1%, Voltage Rating=200V, Automotive=Yes, Automotive Grade="Grade 0", Category=Res, ComponentLink2Description=Datasheet, ComponentLink2URL=https://www.te.com/commerce/DocumentDelivery/DDEController?Action=showdoc&DocId=Data+Sheet%7F1773270-2%7FA%7Fpdf%7FEnglish%7FENG_DS_1773270-2_A.pdf%7F9-2176388-1377, Composition="Thin Film", Device Class L1="Passive Components", Device Class L2=Resistors, Device Class L3="Chip SMD Resistors", Height=0.75mm, Ipc Land Pattern Name=RESC310160X60, Lead Free=Yes, Octopart=https://octopart.com/rq73c2b100kbtdf-te+connectivity-99292337, RoHS=TRUE, Series=RQ73
R2: library part CMP-07231-006698-1, "RES.SHUNT (6432) 2512 100m Ohms ±1% 3W AEC-Q200 SMT"
R3 R8 R10 R11 R59: library part CMP-03412-030854-1, "RES SMD 10K OHM 0.1% 1/4W 1206 RT1206BRB0710KL", Manufacturer=Yageo, Manufacturer Part Number=RT1206BRB0710KL, Package=RT1206, Power Rating=0.25W, Resistance=10KΩ, Temperature="-55°C to +155°C", Temperature Coefficient="10 ppm/°C", Temperature Range High=+155°C, Temperature Range Low=-55°C, Tolerance=0.005, Voltage Rating=200V, Automotive=No, Category=Res, ComponentLink2Description=Datasheet, ComponentLink2URL=http://www.yageo.com/documents/recent/PYu-RT_1-to-0.01_RoHS_L_9.pdf, Composition="Thin Film", Device Class L1="Passive Components", Device Class L2=Resistors, Device Class L3="Chip SMD Resistors", Digikey Description="RES SMD 10K OHM 0.1% 1/4W 1206", Footprint Url=http://www.yageo.com/exep/pages/download/literatures/PYu-R_Mount_10.pdf, Height=0.65mm, Ipc Land Pattern Name=RESC310160X55, Lead Free=Yes, Mouser Description="Thin Film Resistors 1/4W 10K ohm .1% 10ppm", Octopart=https://octopart.com/rt1206brb0710kl-yageo-71402166, RoHS=TRUE, Series=RT
R5 R9: library part CMP-03412-033789-1, "RES SMD 33K OHM 0.25% 1/4W 1206 RT1206CRB0733KL", Manufacturer=Yageo, Manufacturer Part Number=RT1206CRB0733KL, Package=RT1206, Power Rating=0.25W, Resistance=33KΩ, Temperature="-55°C to +155°C", Temperature Coefficient="10 ppm/°C", Temperature Range High=+155°C, Temperature Range Low=-55°C, Tolerance=0.01, Voltage Rating=200V, Automotive=No, Category=Res, ComponentLink2Description=Datasheet, ComponentLink2URL=http://www.yageo.com/documents/recent/PYu-RT_1-to-0.01_RoHS_L_9.pdf, Composition="Thin Film", Device Class L1="Passive Components", Device Class L2=Resistors, Device Class L3="Chip SMD Resistors", Digikey Description="RES SMD 33K OHM 0.25% 1/4W 1206", Footprint Url=http://www.yageo.com/exep/pages/download/literatures/PYu-R_Mount_10.pdf, Height=0.65mm, Ipc Land Pattern Name=RESC310160X55, Lead Free=Yes, Octopart=https://octopart.com/rt1206crb0733kl-yageo-71403169, RoHS=TRUE, Series=RT
R7 R12 R13 R14: library part CMP-03412-045148-1, "Thin Film Chip Resistors Automotive Grade 4.7kΩ 0.1% 25ppm/°C 1206 AT1206BRD074K7L"